# Altium PCB IO_Buffer_SN74AHCT541.PcbDoc
Units mil, origin at the board's own origin, x right, y up, seen from the top; angles counter-clockwise.
Board outline 2700 x 2300 mil, 2 copper layers (Top Layer, Bottom Layer); 19 components, 52 nets, 152 pads, 284 vias.
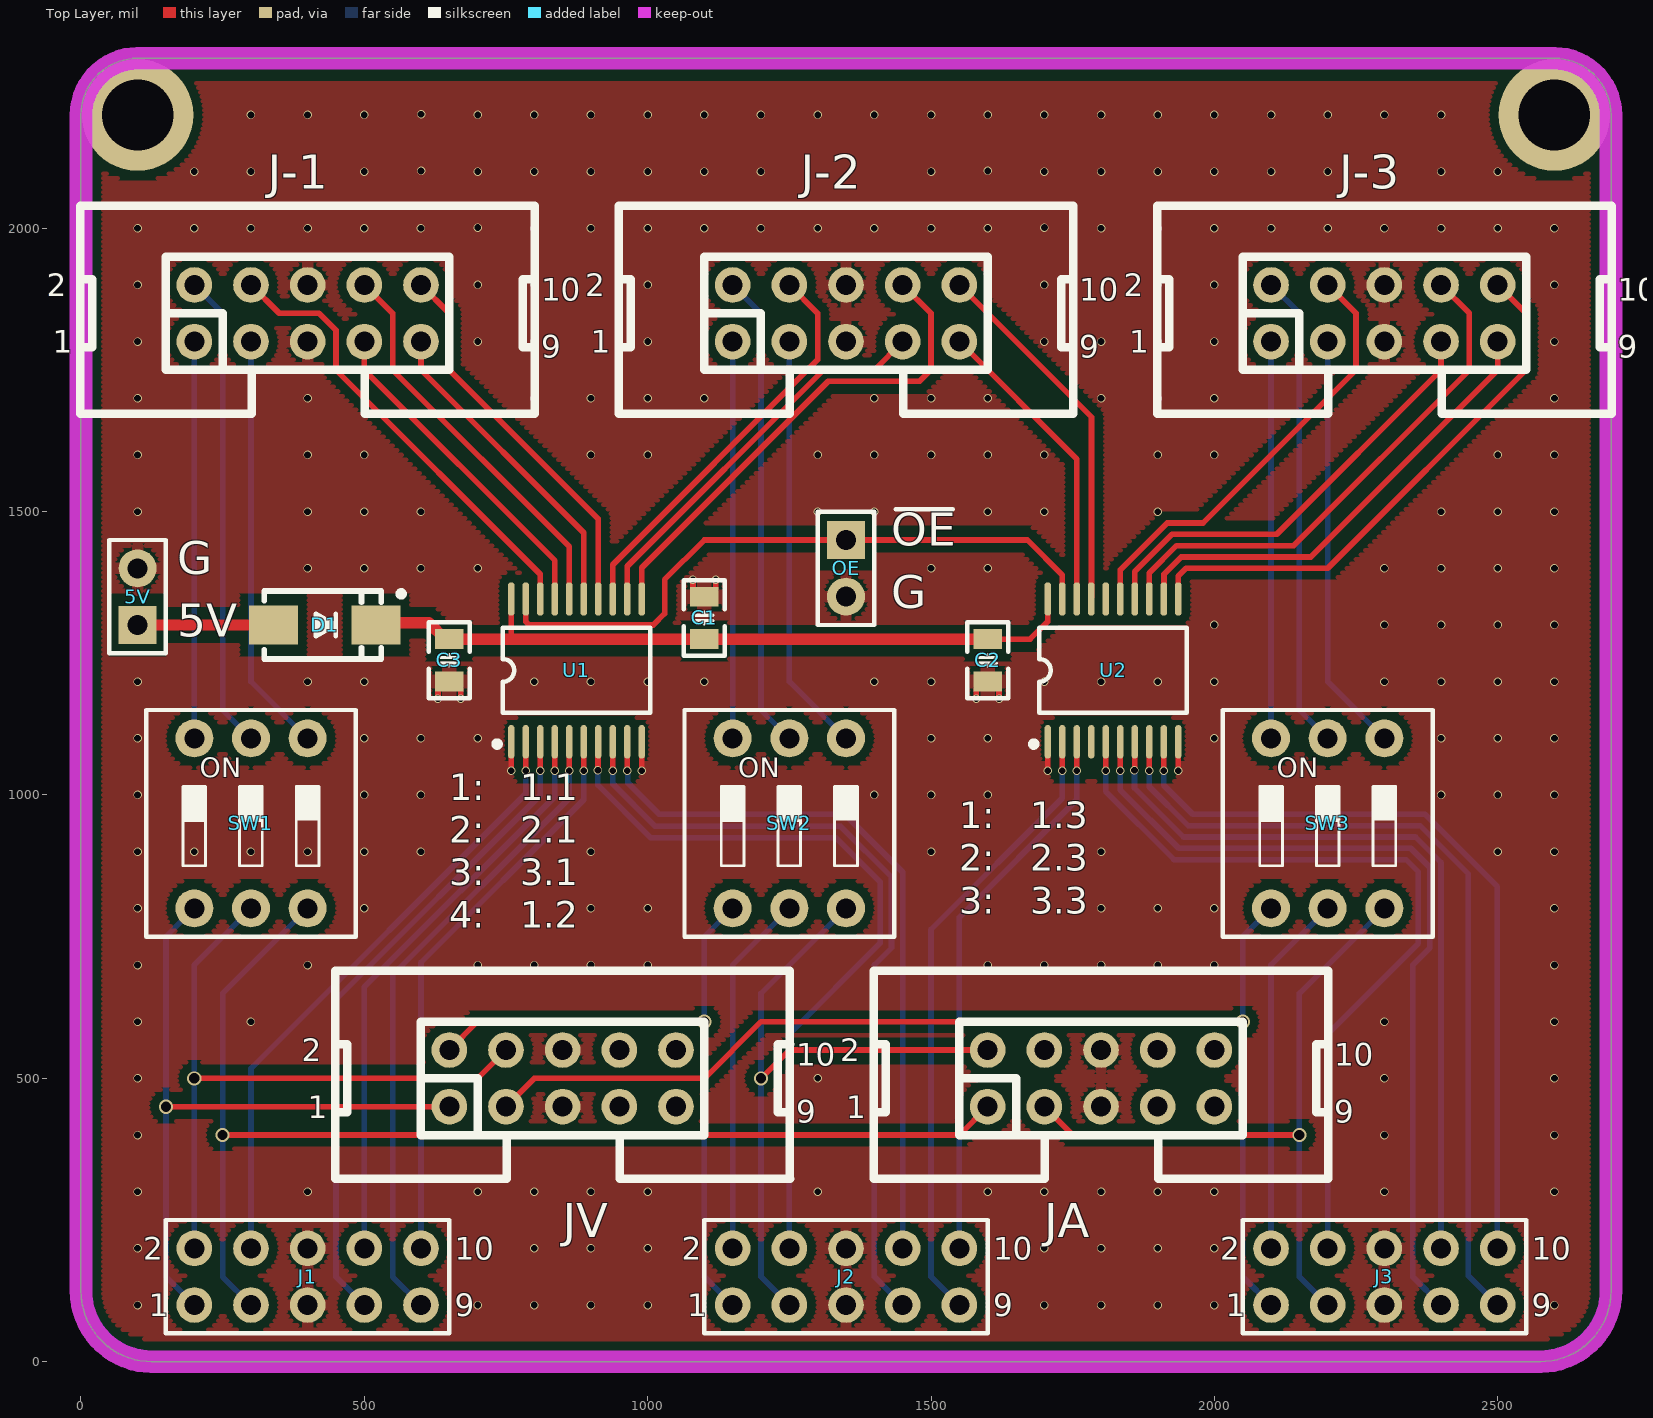
[diagram p0: Top Layer view]
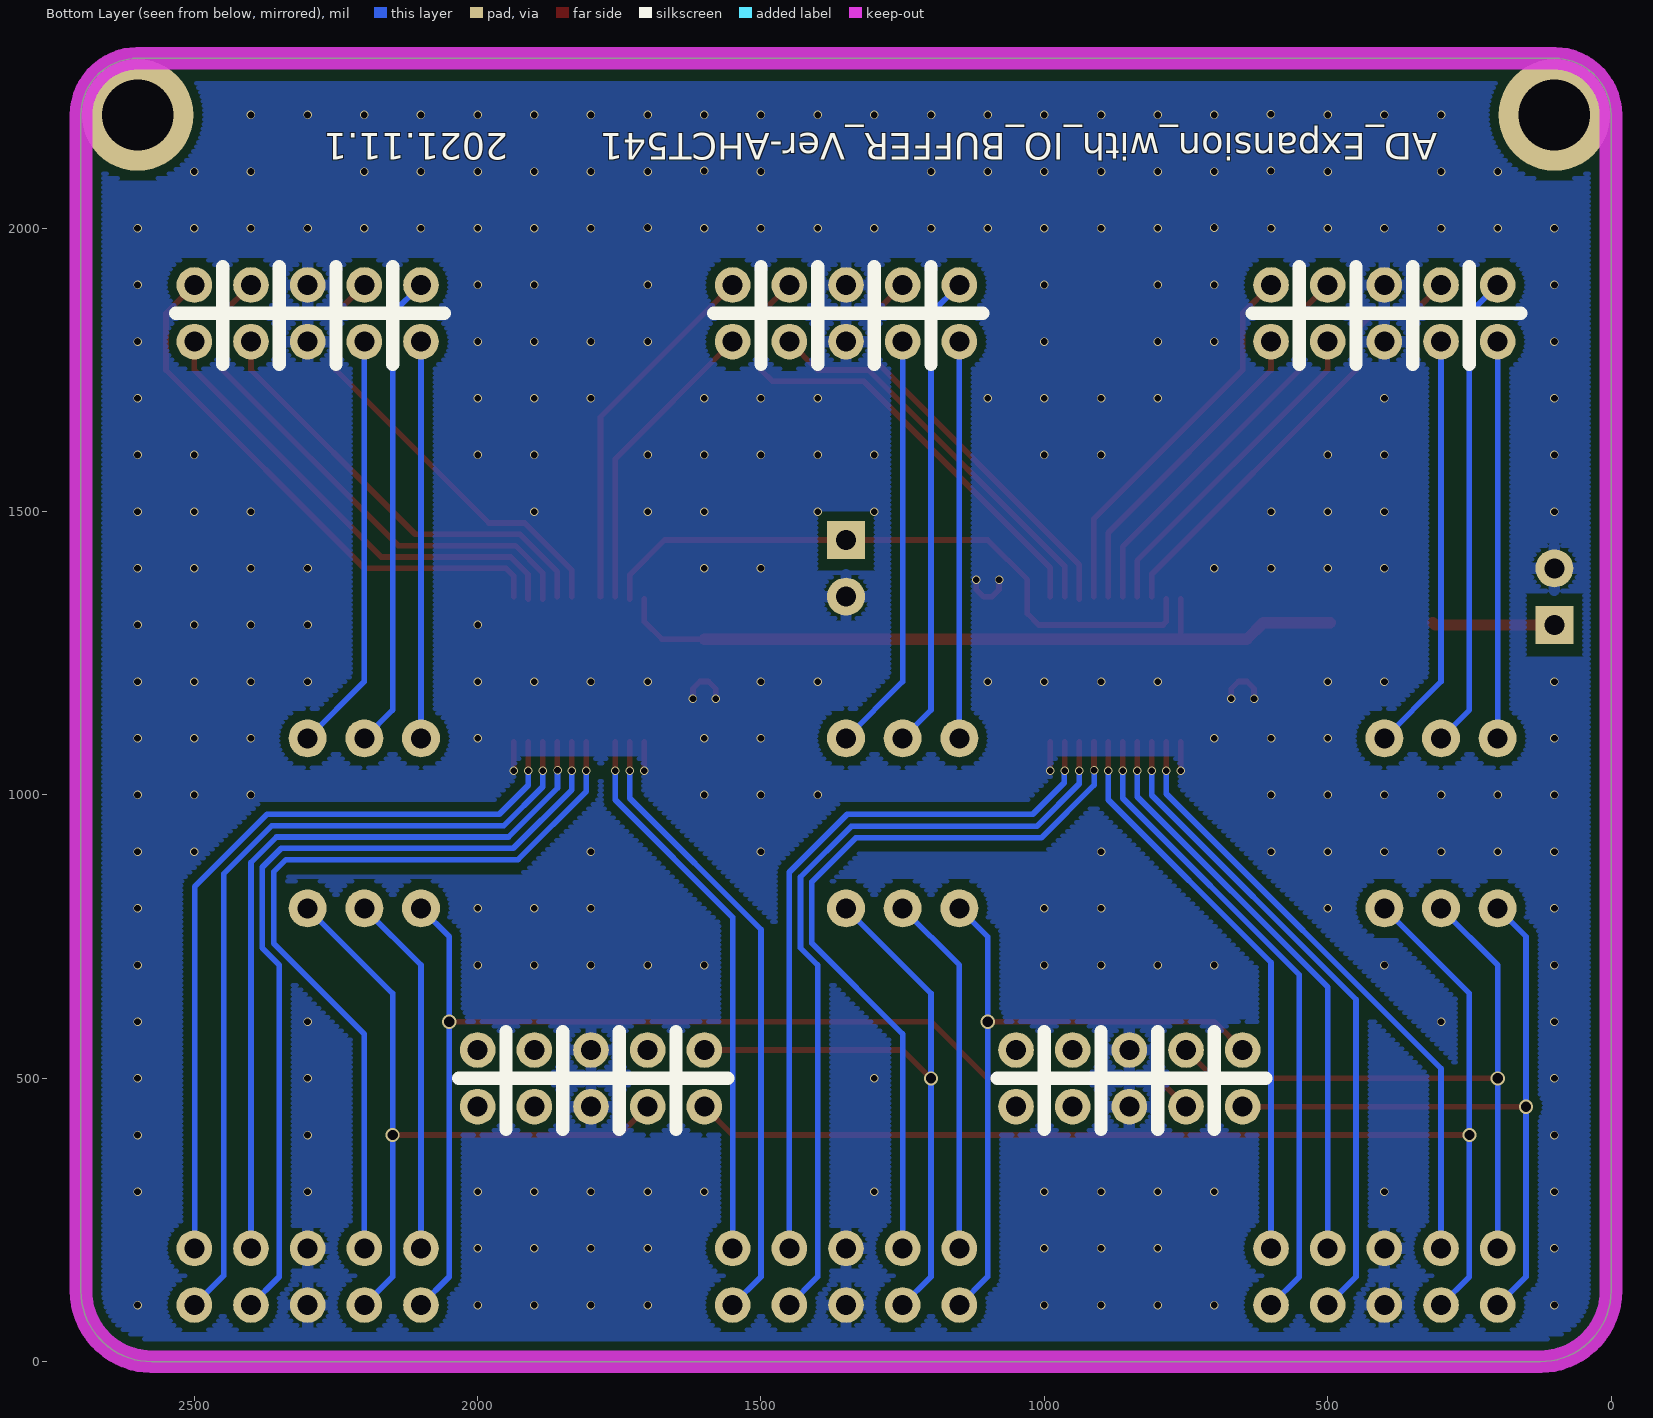
[diagram p1: Bottom Layer view, seen from below]

## Layer stack, top to bottom
Top Solder: solder mask 0.4, Solder Resist, Dk 3.5
Top Layer: signal copper 1.4
Dielectric 1: dielectric 12.6, FR-4, Dk 4.8
Bottom Layer: signal copper 1.4
Bottom Solder: solder mask 0.4, Solder Resist, Dk 3.5

## Board outline
0,125 0,1699.61 0,1700 0,2200 cw(c100,2200) 100,2300 2600,2300 cw(c2600,2200) 2700,2200 2700,1700 2700,125 cw(c2575,125) 2575,0 125,0 cw(c125,125)

## Design rules (kind name [scope] priority, off if disabled: settings)
Clearance [All] p1: gap=15 ignorepadtopadclearanceinfootprint=FALSE except(0: Arc-Hole Track-Hole SMDPad-Hole THPad-Hole Via-Hole Fill-Hole Poly-Hole Region-Hole Text-Hole; 10: Arc-Arc Arc-Track Arc-SMDPad Arc-THPad Arc-Via Arc-Text Track-Track Track-SMDPad Track-THPad Track-Via Track-Text SMDPad-SMDPad SMDPad-THPad SMDPad-Via SMDPad-Text THPad-THPad THPad-Via THPad-Text Via-Via Via-Text Text-Text)
HoleSize [All] p1 off: absolutevalues=TRUE maxlimit=100 minlimit=1 maxpercent=80.000 minpercent=20.000
HoleToHoleClearance [All] p1 off: gap=10 allowstackedmicrovias=TRUE
MinimumSolderMaskSliver [All] p1 off: minsoldermaskwidth=10
PolygonConnect [All] p1: thpad.connectstyle=Relief thpad.reliefconductorwidth=20 thpad.reliefentries=4 thpad.polygonreliefangle="90 Angle" thpad.airgapwidth=5 smdpad.connectstyle=Relief smdpad.reliefconductorwidth=25 smdpad.reliefentries=4 smdpad.polygonreliefangle="90 Angle" smdpad.airgapwidth=5 via.connectstyle=Direct via.reliefconductorwidth=10 via.reliefentries=4 via.polygonreliefangle="90 Angle" via.airgapwidth=10
RoutingVias [All] p1: holewidth=28 width=50 viastyle="Through Hole" minholewidth=28 minwidth=50 maxholewidth=28 maxwidth=50
SilkToSilkClearance [All] p1 off: silktosilkclearance=10
SilkToSolderMaskClearance [IsPad] p1 off: minsilkscreentomaskgap=10 clearancetoexposedcopper=TRUE
SolderMaskExpansion [All] p1: expansion=4 istentingtop=FALSE
Width [All] p1: maxlimit=20 minlimit=10 preferedwidth=10
25 further rules are at their usual default settings.

## Components (designator, comment, footprint, x,y, rotation, side; value= is the part's Value field where it differs from the comment)
5V "HDR-1X2" HDR2.54-LI-2P 100,1350 r90 top
C1 "475" "C 0805_L" 1100,1312.4 r270 top
C2 "104" "C 0805_L" 1600,1237.6 r90 top
C3 "104" "C 0805_L" 650,1237.6 r90 top
D1 "SS14" SMA 430,1300 r0 top
J1 "Header 5X2" HDR2.54-LI-2x5P 400,150 r0 top
J2 "Header 5X2" HDR2.54-LI-2x5P 1350,150 r0 top
J3 "Header 5X2" HDR2.54-LI-2x5P 2300,150 r0 top
J-1 "Header 5X2" IDC2.54-LI-2x5P 200,1800 r0 top
J-2 "Header 5X2" IDC2.54-LI-2x5P 1150,1800 r0 top
J-3 "Header 5X2" IDC2.54-LI-2x5P 2100,1800 r0 top
JA "Header 5X2" IDC2.54-LI-2x5P 1600,450 r0 top
JV "Header 5X2" IDC2.54-LI-2x5P 650,450 r0 top
OE "HDR-1X2" HDR2.54-LI-2P 1350,1400 r270 top
SW1 "SW-3P" "CSW DIP-3P" 300,950 r0 top
SW2 "SW-3P" "CSW DIP-3P" 1250,950 r0 top
SW3 "SW-3P" "CSW DIP-3P" 2200,950 r0 top
U1 "SN74HC541" TSSOP20_N 874.41,1219.88 r90 top
U2 "SN74HC541" TSSOP20_N 1821.26,1219.88 r90 top

## Footprints (in the part's own frame and the unit in brackets; to place one, negate y for a bottom-side part, rotate by r counter-clockwise, add the part's x,y. Pads: shape width x height; smd on the part's side, far side on the other; paste and mask are expansions set on the pad)
"C 0805_L" [mil] "无极性贴片电容"
  rect 35x50 smd: 1(-37.4,0) 2(37.4,0)
  silkscreen extent -67,-36 67,36, body extent -39,-24 39,24, height 20
"CSW DIP-3P" [mm] "9.2*9.9*7mm"
  round 1.7 hole 0.9: 1(-2.54,-3.81) 2(0,-3.81) 3(2.54,-3.81) 4(2.54,3.81) 5(0,3.81) 6(-2.54,3.81)
  silkscreen extent -4.7,-5.08 4.7,5.08, body extent -4.59,-4.95 4.59,4.95, height 6.65
HDR2.54-LI-2P [mm]
  rect 1.7x1.7 hole 0.9: 1(-1.27,0)
  round 1.7 hole 0.9: 2(1.27,0)
  silkscreen extent -2.54,-1.27 2.54,1.27, body extent -2.54,-1.27 2.54,1.27, height 8.5
HDR2.54-LI-2x5P [mm] "双排排针，5x2脚"
  round 1.6 hole 0.9: 1(-5.08,-1.27) 2(-5.08,1.27) 3(-2.54,-1.27) 4(-2.54,1.27) 5(0,-1.27) 6(0,1.27) 7(2.54,-1.27) 8(2.54,1.27) 9(5.08,-1.27) 10(5.08,1.27)
  silkscreen extent -6.35,-2.54 6.35,2.54, body extent -6.35,-2.54 6.35,2.54, height 8.5
IDC2.54-LI-2x5P [mm] "10P简易牛角座"
  round 1.6 hole 0.9: 1(0,0) 2(0,2.54) 3(2.54,0) 4(2.54,2.54) 5(5.08,0) 6(5.08,2.54) 7(7.62,0) 8(7.62,2.54) 9(10.16,0) 10(10.16,2.54)
  silkscreen extent -5.11,-3.23 15.27,6.1, body extent -5.08,-3.08 15.24,5.77, height 9.17
SMA [mm] "4.5x2.6*2.2mm（长宽高，不包括引脚）"
  rect 2.2x1.75 smd: 1(-2.3,0) 2(2.3,0)
  silkscreen extent -2.7,-1.52 3.56,1.52, body extent -2.53,-1.3 2.58,1.3, height 2.15
TSSOP20_N [mm] "6.5*6.4*1（长宽高）"
  oval 1.5x0.3 smd: 1(-3.2,2.925) 2(-3.2,2.275) 3(-3.2,1.625) 4(-3.2,0.975) 5(-3.2,0.325) 6(-3.2,-0.325) 7(-3.2,-0.975) 8(-3.2,-1.625) 9(-3.2,-2.275) 10(-3.2,-2.925) 11(3.2,-2.925) 12(3.2,-2.275) 13(3.2,-1.625) 14(3.2,-0.975) 15(3.2,-0.325) 16(3.2,0.325) 17(3.2,0.975) 18(3.2,1.625) 19(3.2,2.275) 20(3.2,2.925)
  silkscreen extent -3.43,-3.3 1.91,3.69, body extent -3.2,-3.25 3.2,3.25, height 1.03

## Part data
5V OE: library part "Header 2", "2P接插件", BOM名称=2P接插件, 下单链接=https://item.taobao.com/item.htm?ft=t&id=613637044352, 淘宝ID=小糖豆的小窝窝
C1 C2 C3: library part C, "贴片电容", BOM名称=贴片电容, 下单链接=https://item.taobao.com/item.htm?ft=t&id=613637044352, 淘宝ID=小糖豆的小窝窝
D1: "肖特基二极管", BOM名称=肖特基二极管, 下单链接=https://item.taobao.com/item.htm?ft=t&id=613637044352, 淘宝ID=小糖豆的小窝窝
J1 J2 J3 J-1 J-2 J-3 JA JV: "5*2P接插件", BOM名称=5*2P接插件, 下单链接=https://item.taobao.com/item.htm?ft=t&id=613637044352, 淘宝ID=小糖豆的小窝窝
SW1 SW2 SW3: "3路编码开关", BOM名称=3路编码开关, 下单链接=https://item.taobao.com/item.htm?ft=t&id=613637044352, 淘宝ID=小糖豆的小窝窝
U1 U2: "OCTAL BUF AND LINE DRV 3SO", Alias2=小糖豆的小窝窝

## Free pads (board coordinates)
  round 196.85 hole 125.98: Q(100,2200) Q(2600,2200)

## Via types
v1: diameter 15, hole 12, Top Layer to Bottom Layer, 277 vias
v2: diameter 25, hole 18, Top Layer to Bottom Layer, tented bottom, 7 vias

## Nets (pads, with @x,y where several pads share a name; then routed paths per layer and width w, separated by ;. In a path a pad name is that pad's centre, name@x,y a point inside that pad or via, vN(x,y) a via of type N, cw(c..) or ccw(c..) an arc to the next point about the centre after c; other vN are vias at no path point)
1.1: J-1.1 SW1.6 | length 700
  Bottom Layer w10: SW1.6 J-1.1
1.2: J-1.2 SW1.5 | length 841.4
  Bottom Layer w10: J-1.2 250,1850 250,1150 SW1.5
1.3: J-1.3 SW1.4 | length 991.4
  Bottom Layer w10: 300,1550 J-1.3 300,1200 SW1.4
1.4: J-1.4 U1.18 | length 802.6
  Top Layer w10: J-1.4 350,1850 420,1850 450,1820 450,1750 810.43,1389.57 U1.18@810.43,1349.8
1.5: J-1.7 U1.17 | length 589.2
  Top Layer w10: J-1.7 500,1750 836.33,1413.67 U1.17@836.33,1350.11
1.6: J-1.8 U1.16 | length 700
  Top Layer w10: J-1.8 550,1850 550,1750 861.61,1438.39 U1.16@861.61,1349.8
1.7: J-1.9 U1.15 | length 569.2
  Top Layer w10: J-1.9 600,1750 887.2,1462.8 U1.15@887.2,1349.8
1.8: J-1.10 U1.14 | length 679.8
  Top Layer w10: J-1.10 650,1850 650,1750 912.8,1487.2 U1.14@912.8,1349.8
2.1: J-2.1 SW2.6 | length 700
  Bottom Layer w10: SW2.6 J-2.1
2.2: J-2.2 SW2.5 | length 841.4
  Bottom Layer w10: J-2.2 1200,1850 1200,1150 SW2.5
2.3: J-2.3 SW2.4 | length 741.4
  Bottom Layer w10: J-2.3 1250,1200 SW2.4
2.4: J-2.4 U1.13 | length 724.6
  Top Layer w10: U1.13 938.39,1406.37 1300,1767.99 1300,1850 J-2.4
2.5: J-2.7 U1.12 | length 704.1
  Top Layer w10: U1.12@963.98,1349.8 963.98,1403.68 1310.3,1750 1400,1750 J-2.7
2.6: J-2.8 U1.11 | length 876.9
  Top Layer w10: U1.11@989.57,1349.8 989.57,1400.98 1318.58,1730 1480,1730 1500,1750 1500,1850 J-2.8
2.7: J-2.9 U2.18 | length 536.1
  Top Layer w10: J-2.9 1757.28,1592.72 U2.18@1757.28,1349.8
2.8: J-2.10 U2.17 | length 646.5
  Top Layer w10: J-2.10 1783.18,1666.82 U2.17@1783.18,1350.11
3.1: J-3.1 SW3.6 | length 700
  Bottom Layer w10: SW3.6 J-3.1
3.2: J-3.2 SW3.5 | length 841.4
  Bottom Layer w10: J-3.2 2150,1850 2150,1150 SW3.5
3.3: J-3.3 SW3.4 | length 741.4
  Bottom Layer w10: J-3.3 2200,1200 SW3.4
3.4: J-3.4 U2.15 | length 780.2
  Top Layer w10: U2.15@1834.05,1349.8 1834.05,1397.19 1916.86,1480 1980,1480 2250,1750 2250,1850 J-3.4
3.5: J-3.7 U2.14 | length 782.3
  Top Layer w10: U2.14@1859.65,1349.8 1859.65,1394.5 1925.15,1460 2110,1460 2400,1750 J-3.7
3.6: J-3.8 U2.13 | length 929.8
  Top Layer w10: U2.13 1885.24,1391.8 1933.43,1440 2140,1440 2450,1750 2450,1850 J-3.8
3.7: J-3.9 U2.12 | length 831.9
  Top Layer w10: U2.12 1911.17,1346.21 1911.17,1389.46 1941.72,1420 2170,1420 2500,1750 J-3.9
3.8: J-3.10 U2.11 | length 971.5
  Top Layer w10: U2.11@1936.42,1349.8 1936.42,1386.42 1950,1400 2200,1400 2550,1750 2550,1850 J-3.10
+5: C1.2 C2.2 C3.2 D1.2 U1.20 U2.20 | length 1346.1
  Top Layer w10: 759.25,1275 U1.20 ; C2.2 1675,1275 1705.76,1305.76 1705.76,1345.52 U2.20
  Top Layer w20: D1.2@495.48,1303.94 613.56,1303.94 642.5,1275 C3.2 750,1275 759.25,1275 C1.2 C2.2
E\N\: OE.1 U1.19 U2.19 | length 1154.6
  Top Layer w10: U1.19 784.84,1305.86 790.7,1300 1010,1300 1030,1320 1030,1380 1100,1450 OE.1 1670,1450 1731.69,1388.31 U2.19
GND: 5V.2 C1.1 C2.1 C3.1 J1.5 J1.6 J2.5 J2.6 J3.5 J3.6 J-1.5 J-1.6 J-2.5 J-2.6 J-3.5 J-3.6 JA.5 JA.6 JV.5 JV.6 OE.2 U1.1 U1.10 U2.1 U2.10 | length 462
  Top Layer w10: v1(630,1170) 630,1187.7 642.5,1200.2 C3.1 657.5,1200.2 670,1187.7 v1(670,1170) ; v1(759.25,1042.72) U1.1 ; v1(989.57,1042.72) U1.10 ; v1(1080,1380) 1080,1362.3 1092.5,1349.8 C1.1 1107.5,1349.8 1120,1362.3 v1(1120,1380) ; v1(1580,1170) 1580,1187.7 1592.5,1200.2 C2.1 1607.5,1200.2 1620,1187.7 v1(1620,1170) ; v1(1706.1,1042.72) U2.1 ; v1(1936.42,1042.72) U2.10
  other v1: 100,100 700,100 800,100 900,100 1000,100 1700,100 1800,100 1900,100 2000,100 2600,100 100,200 800,200 900,200 1000,200 1700,200 1800,200 1900,200 2000,200 100,300 400,300 700,300 800,300 900,300 1000,300 1300,300 1600,300 1700,300 1800,300 1900,300 2000,300 2300,300 2600,300 100,400 2300,400 2600,400 100,500 1300,500 2300,500 2600,500 100,600 300,600 2300,600 2600,600 100,700 400,700 700,700 800,700 900,700 1000,700 1600,700 1700,700 1800,700 1900,700 2000,700 2600,700 100,800 500,800 900,800 1000,800 1800,800 1900,800 2000,800 2600,800 100,900 200,900 300,900 400,900 500,900 600,900 900,900 1500,900 1800,900 2500,900 2600,900 100,1000 200,1000 300,1000 400,1000 500,1000 600,1000 1400,1000 1500,1000 1600,1000 2400,1000 2500,1000 2600,1000 100,1100 500,1100 600,1100 700,1100 1500,1100 1600,1100 2000,1100 2400,1100 2500,1100 2600,1100 100,1200 400,1200 500,1200 800,1200 900,1200 1000,1200 1100,1200 1400,1200 1500,1200 1700,1200 1800,1200 1900,1200 2000,1200 2300,1200 2400,1200 2500,1200 2600,1200 2000,1300 2300,1300 2400,1300 2500,1300 2600,1300 400,1400 500,1400 600,1400 700,1400 1500,1400 1600,1400 2300,1400 2400,1400 2500,1400 2600,1400 100,1500 400,1500 500,1500 600,1500 1300,1500 1400,1500 1600,1500 1700,1500 1900,1500 2400,1500 2500,1500 2600,1500 100,1600 400,1600 500,1600 900,1600 1000,1600 1300,1600 1400,1600 1500,1600 1600,1600 1700,1600 1900,1600 2000,1600 2500,1600 2600,1600 100,1700 400,1700 800,1700 900,1700 1000,1700 1100,1700 1400,1700 1500,1700 1600,1700 1800,1700 1900,1700 2000,1700 2600,1700 100,1800 700,1800 800,1800 1000,1800 1700,1800 1800,1800 1900,1800 2000,1800 2600,1800 100,1900 700,1900 800,1900 1000,1900 1700,1900 1900,1900 2000,1900 2600,1900 100,2000 200,2000 300,2000 400,2000 500,2000 600,2000 800,2000 900,2000 1000,2000 1100,2000 1200,2000 1300,2000 1400,2000 1500,2000 1600,2000 1800,2000 1900,2000 2000,2000 2100,2000 2200,2000 2300,2000 2400,2000 2500,2000 2600,2000 700.08,2001.27 1700.08,2001.27 200,2100 300,2100 500,2100 700,2100 800,2100 900,2100 1000,2100 1100,2100 1200,2100 1500,2100 1700,2100 1800,2100 1900,2100 2000,2100 2100,2100 2200,2100 2400,2100 2500,2100 600.08,2101.27 1600.08,2101.27 300,2200 400,2200 500,2200 700,2200 800,2200 900,2200 1000,2200 1100,2200 1200,2200 1300,2200 1400,2200 1500,2200 1600,2200 1700,2200 1800,2200 1900,2200 2000,2200 2100,2200 2200,2200 2300,2200 2400,2200 600.08,2201.27
Net5V_1: 5V.1 D1.1 | length 216
  Top Layer w20: 5V.1 310.44,1300 D1.1@314.37,1303.94
UD1.1: J1.1 JV.1 SW1.1 | length 1241.4
  Top Layer w10: v2(150,450) JV.1
  Bottom Layer w10: J1.1 150,150 v2(150,450) 150,750 SW1.1
UD1.2: J1.2 JV.4 SW1.2 | length 1212.1
  Top Layer w10: v2(200,500) 700,500 JV.4
  Bottom Layer w10: J1.2 v2(200,500) 200,700 SW1.2
UD1.3: J1.3 JA.1 SW1.3 | length 2153.6
  Top Layer w10: v2(250,400) 1550,400 JA.1
  Bottom Layer w10: J1.3 250,150 v2(250,400) 250,650 SW1.3
UD1.4: J1.4 U1.2 | length 1094.7
  Top Layer w10: v1(784.84,1042.72) U1.2
  Bottom Layer w10: J1.4 300,517.47 784.84,1002.31 v1(784.84,1042.72)
UD1.5: J1.7 U1.3 | length 1215.1
  Top Layer w10: v1(810.43,1042.72) U1.3 v1(810.43,1042.72)
  Bottom Layer w10: J1.7 450,150 450,639.18 810.43,999.62 v1(810.43,1042.72)
UD1.6: J1.8 U1.4 | length 1033.1
  Top Layer w10: v1(836.02,1042.72) U1.4
  Bottom Layer w10: J1.8 500,660.9 836.02,996.92 v1(836.02,1042.72)
UD1.7: J1.9 U1.5 | length 1143.7
  Top Layer w10: v1(861.61,1042.72) U1.5
  Bottom Layer w10: J1.9 550,150 550,682.62 861.61,994.23 v1(861.61,1042.72)
UD1.8: J1.10 U1.6 | length 1012.9
  Top Layer w10: v1(887.2,1042.72) U1.6
  Bottom Layer w10: J1.10 600,704.33 887.2,991.54 v1(887.2,1042.72)
UD2.1: J2.1 JV.2 SW2.1 | length 1212.1
  Top Layer w10: JV.2 700,600 v2(1100,600)
  Bottom Layer w10: J2.1 1100,150 v2(1100,600) 1100,750 SW2.1
UD2.2: J2.2 SW2.2 | length 641.4
  Bottom Layer w10: J2.2 1150,700 SW2.2
UD2.3: J2.3 JA.2 SW2.3 | length 1203.6
  Top Layer w10: v2(1200,500) 1250,550 JA.2
  Bottom Layer w10: J2.3 1200,150 v2(1200,500) 1200,650 SW2.3
UD2.4: J2.4 U1.7 | length 1358.5
  Top Layer w10: v1(912.19,1043.61) 912.49,1043.91 912.49,1093.59 U1.7
  Bottom Layer w10: v1(912.19,1043.61) 912.19,1017.73 1005.23,924.69 1332.52,924.69 1410.2,847.01 1410.2,738.48 1250,578.28 J2.4
UD2.5: J2.7 U1.8 | length 1422.6
  Top Layer w10: v1(938.39,1042.72) U1.8
  Bottom Layer w10: v1(938.39,1042.72) 938.39,1019.82 1013.51,944.69 1340.8,944.69 1430.2,855.3 1430.2,730.2 1400,700 1400,150 J2.7
UD2.6: J2.8 U1.9 | length 1287.1
  Top Layer w10: v1(963.98,1042.72) U1.9
  Bottom Layer w10: v1(963.98,1042.72) 964.93,1041.76 964.93,1021.56 1020.54,965.94 1347.83,965.94 1450.2,863.58 1450.2,200.2 J2.8
UD2.7: J2.9 U2.2 | length 1110.6
  Top Layer w10: v1(1731.69,1042.72) U2.2
  Bottom Layer w10: J2.9 1500,150 1500,762.54 1731.69,994.23 v1(1731.69,1042.72)
UD2.8: J2.10 U2.3 | length 1030.9
  Top Layer w10: v1(1757.28,1042.72) U2.3 v1(1757.28,1042.72)
  Bottom Layer w10: J2.10 1550,784.25 1757.28,991.54 v1(1757.28,1042.72)
UD3.1: J3.1 JV.3 SW3.1 | length 2103.6
  Top Layer w10: JV.3 800,500 1100,500 1200,600 v2(2050,600)
  Bottom Layer w10: J3.1 2050,150 v2(2050,600) 2050,750 SW3.1
UD3.2: J3.2 SW3.2 | length 641.4
  Bottom Layer w10: J3.2 2100,700 SW3.2
UD3.3: J3.3 JA.3 SW3.3 | length 1253.6
  Top Layer w10: JA.3 1750,400 v2(2150,400)
  Bottom Layer w10: J3.3 2150,150 v2(2150,400) 2150,650 SW3.3
UD3.4: J3.4 U2.5 | length 1428.5
  Top Layer w10: v1(1808.46,1042.72) U2.5
  Bottom Layer w10: v1(1808.46,1042.72) 1808.46,1006.35 1928.87,885.94 2338.32,885.94 2360,864.26 2360,738.28 2200,578.28 J3.4
UD3.5: J3.7 U2.6 | length 1493
  Top Layer w10: v1(1834.05,1042.72) U2.6
  Bottom Layer w10: v1(1834.05,1042.72) 1834.05,1009.05 1937.16,905.94 2346.6,905.94 2380,872.55 2380,730 2350,700 2350,150 J3.7
UD3.6: J3.8 U2.7 | length 1357.6
  Top Layer w10: v1(1859.04,1043.61) 1859.34,1043.91 U2.7@1859.34,1093.59
  Bottom Layer w10: v1(1859.04,1043.61) 1859.04,1012.35 1945.44,925.94 2354.89,925.94 2400,880.83 J3.8
UD3.7: J3.9 U2.8 | length 1488.4
  Top Layer w10: v1(1885.24,1042.72) U2.8
  Bottom Layer w10: v1(1885.24,1042.72) 1885.24,1014.43 1953.72,945.94 2363.17,945.94 2448.23,860.89 2448.23,151.77 J3.9
UD3.8: J3.10 U2.9 | length 1377.8
  Top Layer w10: v1(1910.83,1042.72) U2.9
  Bottom Layer w10: v1(1910.83,1042.72) 1910.83,1017.13 1962.01,965.94 2371.46,965.94 2499.41,837.99 2499.41,200.59 J3.10
pads on no net: JA.4 JA.7 JA.8 JA.9 JA.10 JV.7 JV.8 JV.9 JV.10 U2.4 U2.16

## Polygon pours and split planes (outlines as drawn)
GND on Bottom Layer "NONET_L02_P-001" (hatched Horizontal grid 8 track 8, remove dead copper, pour order 0): 0,0 2700,0 2700,2300 0,2300
GND on Top Layer "NONET_L02_P-001" (hatched Horizontal grid 8 track 8, remove dead copper, pour order 1): 0,2300 0,0 2700,0 2700,2300

## Keep-outs
Keep-Out Layer:
  lines w40: 0,1699.61 0,125 ccw(c125,125) 125,0 2575,0 ccw(c2575,125) 2700,125 2700,1700 2700,2200 ccw(c2600,2200) 2600,2300 100,2300 ccw(c100,2200) 0,2200 0,1700

## Silkscreen, mask and mechanical layers (free items; w line width, h text height)
Top Overlay:
  lines w8: 1437.96,1504.06 1538.56,1504.06
  text "OE" at 1430,1420 h100
  text "G" at 170,1370 h100
  text "G" at 1430,1310 h100
  text "5V" at 170,1260 h100
  text "1:" at 650,975 h80
  text "1.1" at 775,975 h80
  text "1:" at 1550,925 h80
  text "1.3" at 1675,925 h80
  text "2:" at 650,900 h80
  text "2.1" at 775,900 h80
  text "2:" at 1550,850 h80
  text "2.3" at 1675,850 h80
  text "3:" at 650,825 h80
  text "3.1" at 775,825 h80
  text "3:" at 1550,775 h80
  text "3.3" at 1675,775 h80
  text "4:" at 650,750 h80
  text "1.2" at 775,750 h80
Bottom Overlay:
  text "AD_Expansion_with_IO_BUFFER_Ver-AHCT541        2021.11.1" at 307.09,2184 h80 r180
Mechanical 1:
  lines w5: -2.5,1699.61 ccw(c0,1699.61) -2.5,1699.61 ; -2.5,1699.61 ccw(c0,1699.61) -2.5,1699.61 ; -2.5,1699.61 -2.5,1700 ; -2.5,1699.61 -2.5,125 ccw(c125,125) 125,-2.5 2575,-2.5 ccw(c2575,125) 2702.5,125 2702.5,1699.98 ; -2.5,1700 -2.5,2200 cw(c100,2200) 100,2302.5 2600,2302.5 cw(c2600,2200) 2702.5,2200 2702.5,1700 ; -2.5,1700 -2.5,1700 ; 2702.5,1699.98 ccw(c2700,1700) 2702.5,1700 ; 2702.5,1699.98 ccw(c2700,1700) 2702.5,1700 ; 2702.5,1699.98 2702.5,1700

## Text inside footprints (layer, text, board x,y; h text height)
J1: Top Overlay "2" at 110,180 h40; Top Overlay "1" at 120,80 h40; Top Overlay "9" at 660,80 h40; Top Overlay "10" at 660,180 h40
J2: Top Overlay "2" at 1060,180 h40; Top Overlay "1" at 1070,80 h40; Top Overlay "9" at 1610,80 h40; Top Overlay "10" at 1610,180 h40
J3: Top Overlay "2" at 2010,180 h40; Top Overlay "1" at 2020,80 h40; Top Overlay "9" at 2560,80 h40; Top Overlay "10" at 2560,180 h40
J-1: Top Overlay "10" at 812,1872 h40; Top Overlay "9" at 812,1772 h40; Top Overlay "1" at -50,1780 h40; Top Overlay "2" at -60,1880 h40
J-2: Top Overlay "10" at 1762,1872 h40; Top Overlay "9" at 1762,1772 h40; Top Overlay "1" at 900,1780 h40; Top Overlay "2" at 890,1880 h40
J-3: Top Overlay "10" at 2712,1872 h40; Top Overlay "9" at 2712,1772 h40; Top Overlay "1" at 1850,1780 h40; Top Overlay "2" at 1840,1880 h40
JA: Top Overlay "10" at 2212,522 h40; Top Overlay "9" at 2212,422 h40; Top Overlay "1" at 1350,430 h40; Top Overlay "2" at 1340,530 h40
JV: Top Overlay "10" at 1262,522 h40; Top Overlay "9" at 1262,422 h40; Top Overlay "1" at 400,430 h40; Top Overlay "2" at 390,530 h40
SW1: Top Overlay "ON" at 210,1020 h60
SW2: Top Overlay "ON" at 1160,1020 h60
SW3: Top Overlay "ON" at 2110,1020 h60